# Altium PCB nexnclock_one_mainboard_rev_1_0.PcbDoc (part 2 of 2)
Units mm, origin at the board's own origin, x right, y up, seen from the top; angles counter-clockwise.
Board outline 106 x 35 mm, 2 copper layers (Top Layer, Bottom Layer), stack 1.571 mm thick; 128 components, 112 nets, 447 pads, 312 vias.
Unrouted connection lines stored in the file: 3.
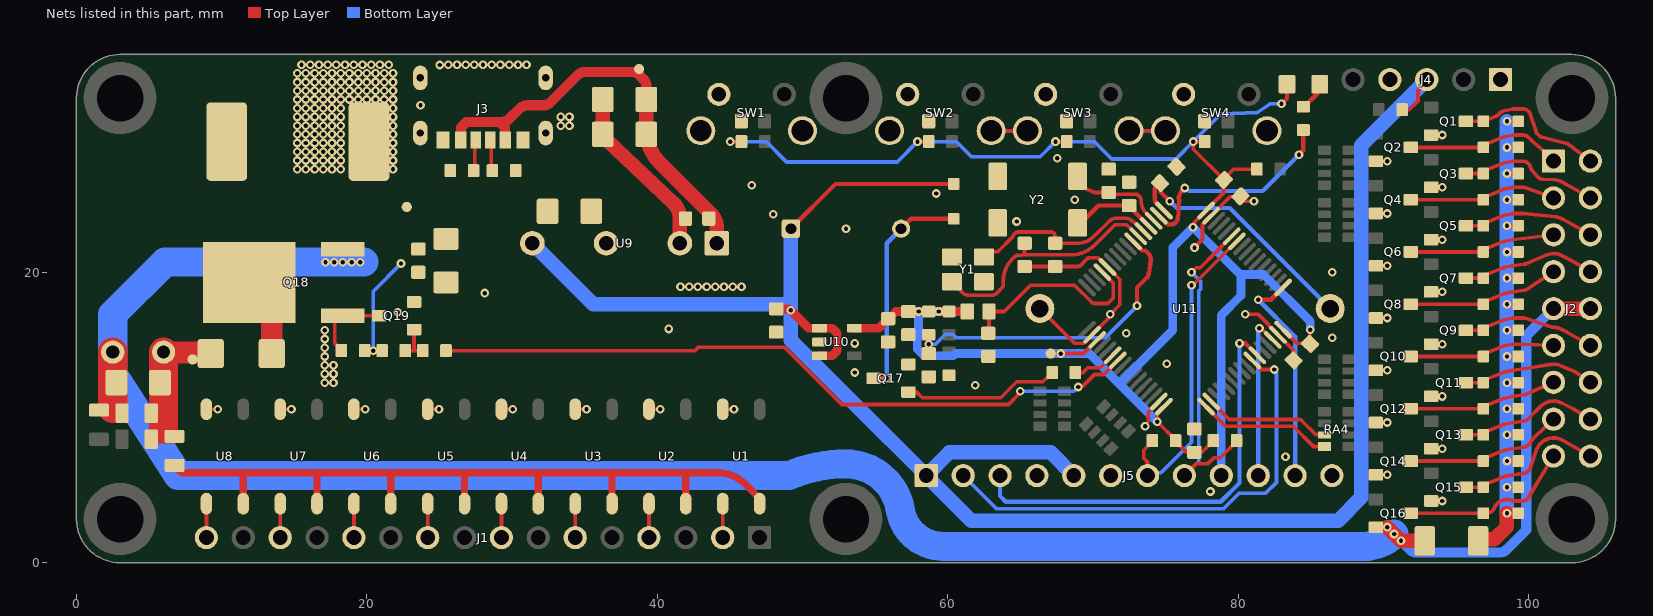
[diagram p2: the nets of this part, all layers, seen from the top]

## Via types
v1: diameter 0.6, hole 0.3, Top Layer to Bottom Layer, tented both sides, 264 vias
v2: diameter 0.6, hole 0.3, Top Layer to Bottom Layer, tented bottom, 48 vias

## Nets (pads, with @x,y where several pads share a name; then routed paths per layer and width w, separated by ;. In a path a pad name is that pad's centre, name@x,y a point inside that pad or via, vN(x,y) a via of type N, cw(c..) or ccw(c..) an arc to the next point about the centre after c; other vN are vias at no path point) (continued)
CATHODE_14: RA4.7 U11.34 | length 8.7
  Top Layer w0.254: U11.34@78.153,11.101 79.4,9.854 84.216,9.854 cw(c84.216,9.6) 84.368,9.803 cw(c84.216,9.6) 84.395,9.78 85.301,8.874 ccw(c85.48,9.054) 85.48,8.8 RA4.7@85.95,8.8
CATHODE_15: RA4.8 U11.33 | length 9.3
  Top Layer w0.254: U11.33@77.8,10.747 79.147,9.4 83.8,9.4 85.2,8 RA4.8@85.95,8
CRYSTAL_IN: C15.1 U11.5 Y1.1 | length 13.3
  Top Layer w0.254: Y1.1@62.5,21.05 62.853,21.403 63.334,21.403 ccw(c63.334,21.657) 63.513,21.477 64.427,22.39 ccw(c64.248,22.57) 64.469,22.445 64.53,22.554 cw(c64.912,22.338) 64.783,22.757 64.81,22.766 cw(c64.885,22.523) 64.885,22.777 67.118,22.777 cw(c67.118,22.523) 67.297,22.703 67.326,22.674 cw(c67.146,22.495) 67.4,22.495 C15.1@67.4,22 67.773,22 68.9,22 ccw(c68.9,23.687) 69.43,22.085 69.613,22.146 ccw(c69.47,22.58) 69.754,22.222 70.066,22.47 ccw(c69.909,22.669) 70.087,22.488 71.132,23.521 cw(c71.633,23.021) 71.134,23.523 cw(c71.633,23.021) 71.206,23.586 cw(c71.481,23.224) 71.208,23.587 ; 71.208,23.587 cw(c71.633,23.021) 71.633,23.729 72.225,23.729 cw(c72.225,23.021) 72.656,23.583 73.027,23.298 U11.5@73.486,22.839
CRYSTAL_OUT: C16.1 U11.6 Y1.3 | length 16.8
  Top Layer w0.254: Y1.3@60.3,19.35 60.773,18.877 60.853,18.797 cw(c60.403,18.349) 60.931,18.702 ccw(c61.457,19.058) 61.456,18.423 62.206,18.423 63.08,18.423 ccw(c63.08,18.87) 63.412,18.571 63.773,18.972 ccw(c63.584,19.142) 63.775,18.974 ccw(c63.584,19.142) 63.838,19.141 63.838,19.438 cw(c65.91,19.438) 64.441,20.899 ; 64.442,20.9 cw(c64.621,20.72) 64.448,20.906 64.612,21.058 cw(c64.912,20.738) 64.903,21.177 65.052,21.18 ccw(c65.046,21.434) 65.068,21.181 65.278,21.199 cw(c65.3,20.946) 65.3,21.2 ; C16.1@65.3,22 65.3,21.2 ; U11.6@73.133,22.485 72.398,23.203 ccw(c72.22,23.021) 72.22,23.275 71.633,23.275 ccw(c71.633,23.021) 71.454,23.201 70.134,21.881 cw(c68.485,23.536) 68.5,21.2 65.3,21.2
CRYSTAL_RTC_IN: C17.1 U11.3 Y2.1 | length 6.9
  Top Layer w0.254: Y2.1@68.95,26.6 68.95,26.302 69.47,25.782 70.052,25.522 ccw(c70.155,25.754) 70.155,25.5 C17.1@71.1,25.5 71.223,25.377 72.887,25.377 cw(c72.887,24.938) 73.327,24.94 cw(c72.887,24.938) 73.327,24.938 ccw(c74.595,24.937) 73.696,24.043 73.734,24.005 U11.3@74.193,23.546
CRYSTAL_RTC_OUT: C18.1 U11.4 Y2.4 | length 6
  Top Layer w0.3: Y2.4@68.95,23.4 69.45,23.65 70.312,24.512 cw(c70.524,24.3) 70.524,24.6 C18.1@72.5,24.6 72.55,24.6 72.85,24.3 72.85,24.182 U11.4@73.84,23.192
EQUAL_CATHODE: D1.1 D2.1 D3.1 D4.1 D5.1 D6.1 D7.1 D8.1 D9.1 D10.1 D11.1 D12.1 D13.1 D14.1 D15.1 D16.1 ZD1.1 | length 43
  Top Layer w0.254: v1(98.525,3.4) D16.1@99.3,3.4 ; v1(98.525,5.2) D15.1@99.3,5.2 ; v1(98.525,7) D14.1@99.3,7 ; v1(98.525,8.8) D13.1@99.3,8.8 ; v1(98.525,10.6) D12.1@99.3,10.6 ; v1(98.525,12.4) D11.1@99.3,12.4 ; v1(98.525,14.2) D10.1@99.3,14.2 ; v1(98.525,16) D9.1@99.3,16 ; v1(98.525,17.8) D8.1@99.3,17.8 ; v1(98.525,19.6) D7.1@99.3,19.6 ; v1(98.525,21.4) D6.1@99.3,21.4 ; v1(98.525,23.2) D5.1@99.3,23.2 ; v1(98.525,25) D4.1@99.3,25 ; v1(98.525,26.8) D3.1@99.3,26.8 ; v1(98.525,28.6) D2.1@99.3,28.6 ; v1(98.525,30.4) D1.1@99.3,30.4
  Top Layer w1: ZD1.1@96.74,1.7 ZD1.1@96.54,1.5 96.64,1.6 97.646,1.6 98.525,2.479 v1(98.525,3.4)
  Bottom Layer w1: v1(98.525,3.4) v1(98.525,5.2) v1(98.525,7) v1(98.525,8.8) v1(98.525,10.6) v1(98.525,12.4) v1(98.525,14.2) v1(98.525,16) v1(98.525,19.6) v1(98.525,21.4) v1(98.525,23.2) v1(98.525,25) v1(98.525,26.8) v1(98.525,28.6) v1(98.525,30.4)
GND: BAT1.2 C1.2 C2.2 C3.2 C4.2 C8.2 C9.2 C10.2 C11.2 C12.2 C13.2 C14.2 C15.2 C16.2 C17.2 C18.2 C19.2 C20.2 C21.2 C22.2 C23.2 C24.2 C25.2 J2.9 J2.10 J4.1 J4.4 J5.4 J5.6 J5.12 Q1.2 Q2.2 Q3.2 Q4.2 Q5.2 Q6.2 Q7.2 Q8.2 Q9.2 Q10.2 Q11.2 Q12.2 Q13.2 Q14.2 Q15.2 Q16.2 Q17.2 Q18.2 Q19.2 R18.2 R20.2 R22.2 SW1.2 SW1.3 SW1.4 SW2.2 SW2.3 SW2.4 SW3.2 SW3.3 SW3.4 SW4.2 SW4.3 SW4.4 U1.3 U2.3 U3.3 U4.3 U5.3 U6.3 U7.3 U8.3 U9.4 U10.2 U11.12 U11.18 U11.31 U11.47 U11.63 Y1.2 Y1.4 Y2.2 Y2.3 ZD1.2 | length 212
  Top Layer w0.254: U8.3@8.95,10.568 v1(9.725,10.568) ; U7.3@14.03,10.568 v1(14.805,10.568) ; U6.3@19.11,10.568 v1(19.885,10.568) ; U5.3@24.19,10.568 v1(24.965,10.568) ; U4.3@29.27,10.568 v1(30.045,10.568) ; U3.3@34.35,10.568 v1(35.125,10.568) ; U2.3@39.43,10.568 v1(40.205,10.568) ; U1.3@44.51,10.568 v1(45.285,10.568) ; SW2.4@63,29.75 SW3.3@65.5,29.75 ; C16.2@65.3,20.4 C15.2@67.4,20.4 68.97,20.4 ccw(c68.97,20.654) 69.122,20.451 ccw(c68.97,20.654) 69.149,20.474 69.601,20.926 ; BAT1.2@66.35,17.5 68.736,15.114 69.355,15.114 69.938,15.697 U11.18@69.951,15.697 71.134,16.88 71.134,17.034 v1(71.2,17.1) 71.855,17.755 71.855,19.52 U11.12@71.011,20.364 70.435,20.928 ccw(c70.257,20.746) 70.257,21 69.78,21 ccw(c69.78,20.746) 69.628,20.949 ccw(c69.78,20.746) 69.601,20.926 ; SW3.4@72.5,29.75 SW4.3@75,29.75 ; v1(73.6,9.4) 73.6,9.494 73.814,9.707 73.814,10.355 74.547,11.088 U11.31@74.547,11.101 ; v1(77,21.7) 77.552,22.252 77.552,23.286 78.153,23.887 U11.63@78.153,23.899 79.453,25.199 80.13,25.199 C19.2@80.166,25.234 80.5,24.9 v1(81.1,24.9) ; v1(80.5,17.1) 81.412,17.1 82.102,16.41 82.102,16.344 U11.47@82.749,15.697 83.804,14.642 83.804,14.432 83.799,14.426 83.834,14.391 C20.2@83.834,13.934 ; Q16.2@89.5,2.45 v1(90.275,2.45) ; Q14.2@89.5,6.05 v1(90.275,6.05) ; Q12.2@89.5,9.65 v1(90.275,9.65) ; Q10.2@89.5,13.25 v1(90.275,13.25) ; Q8.2@89.5,16.85 v1(90.275,16.85) ; Q6.2@89.5,20.45 v1(90.275,20.45) ; Q4.2@89.5,24.05 v1(90.275,24.05) ; Q2.2@89.5,27.65 v1(90.275,27.65) ; Q15.2@93.3,4.25 v1(94.075,4.25) ; Q13.2@93.3,7.85 v1(94.075,7.85) ; Q11.2@93.3,11.45 v1(94.075,11.45) ; Q9.2@93.3,15.05 v1(94.075,15.05) ; Q7.2@93.3,18.65 v1(94.075,18.65) ; Q5.2@93.3,22.25 v1(94.075,22.25) ; Q3.2@93.3,25.85 v1(94.075,25.85) ; Q1.2@93.3,29.45 v1(94.075,29.45)
  Top Layer w1: v1(90.275,2.45) v1(91.225,1.5) ZD1.2@92.86,1.5 ; J2.9@101.73,17.5 J2.10@104.27,17.5
  Top Layer w2: 2.5,10.625 C24.2@2.5,14.5
  Bottom Layer w0.254: SW2.4@63,29.75 SW3.3@65.5,29.75 ; SW3.4@72.5,29.75 SW4.3@75,29.75
  Bottom Layer w0.7: v1(91.225,1.5) 91.821,0.904 ccw(c92.315,1.4) 92.315,0.7 98.01,0.7 ccw(c98.01,1.4) 98.43,0.84 ccw(c98.01,1.4) 98.505,0.905 99.85,2.25 99.85,15.62 J2.9@101.73,17.5
  Bottom Layer w2: v1@19.8,20.7 6.1,20.7 2.5,17.1 C24.2@2.5,14.5 2.5,12.978 7,6 49.078,6 cw(c53,-3.214) 53,6.8 cw(c53,3) 56.749,3.621 ccw(c59.708,4.117) 59.708,1.117 88.649,1.117 ccw(c88.65,4.117) v1(90.75,1.975)
  other v1: 78.1,4.9 83.275,7.3 61.9,12.225 17.1,12.4 17.7,12.4 17.1,13 17.7,13 53.6,13.1 17.1,13.6 17.7,13.6 75.1,13.7 17.1,14.2 17.1,14.8 53.6,15.1 17.1,15.4 86.5,15.5 72.3,15.8 17.1,16 40.8,16.1 22.125,17.25 28.122,18.566 41.6,19 42.2,19 42.8,19 43.4,19 44,19 44.6,19 45.2,19 45.8,19 86.5,20 17.15,20.7 17.75,20.7 18.35,20.7 18.95,20.7 19.55,20.7 53,23 64.75,23.5 48,24 68.75,25 59.225,25.425 46.5,26 67.55,27.85
HOT_ANODE_0: J1.2 U1.4 | length 2.3
  Top Layer w0.254: J1.2@44.51,1.73 U1.4@44.51,4.068
HOT_ANODE_1: J1.4 U2.4 | length 2.3
  Top Layer w0.254: J1.4@39.43,1.73 U2.4@39.43,4.068
HOT_ANODE_2: J1.6 U3.4 | length 2.3
  Top Layer w0.254: J1.6@34.35,1.73 U3.4@34.35,4.068
HOT_ANODE_3: J1.8 U4.4 | length 2.3
  Top Layer w0.254: J1.8@29.27,1.73 U4.4@29.27,4.068
HOT_ANODE_4: J1.10 U5.4 | length 2.3
  Top Layer w0.254: J1.10@24.19,1.73 U5.4@24.19,4.068
HOT_ANODE_5: J1.12 U6.4 | length 2.3
  Top Layer w0.254: J1.12@19.11,1.73 U6.4@19.11,4.068
HOT_ANODE_6: J1.14 U7.4 | length 2.3
  Top Layer w0.254: J1.14@14.03,1.73 U7.4@14.03,4.068
HOT_ANODE_7: J1.16 U8.4 | length 2.3
  Top Layer w0.254: J1.16@8.95,1.73 U8.4@8.95,4.068
HOT_CATHODE_0: D1.2 J2.2 Q1.3 | length 10.4
  Top Layer w0.254: Q1.3@95.7,30.4 D1.2@96.9,30.4 97.15,30.502 97.78,30.758 ccw(c97.608,31.174) 97.951,30.883 cw(c98.525,30.4) 98.373,31.134 98.87,31.239 cw(c98.98,30.72) 98.98,31.25 99.58,31.25 99.62,31.25 cw(c99.62,30.72) 100.122,30.889 100.527,29.689 ccw(c100.953,29.832) 100.645,29.505 100.646,29.504 100.76,29.398 ccw(c101.066,29.727) 100.957,29.291 102.576,28.895 cw(c102.45,28.38) 102.771,28.802 J2.2@104.27,27.66
HOT_CATHODE_1: D2.2 J2.1 Q2.3 | length 10.7
  Top Layer w0.254: Q2.3@91.9,28.6 D2.2@96.9,28.6 97.15,28.85 98.242,29.295 cw(c98.525,28.6) 98.371,29.334 98.871,29.439 cw(c98.98,28.92) 98.978,29.45 ; 98.978,29.45 99.62,29.45 cw(c99.62,28.92) 99.948,29.337 cw(c99.67,28.983) 99.949,29.335 cw(c99.62,28.92) 99.951,29.334 cw(c99.67,28.982) 99.957,29.329 cw(c99.62,28.92) 99.986,29.303 100.173,29.124 ccw(c100.899,29.884) 100.178,29.12 100.181,29.117 100.349,28.96 ccw(c101.066,29.727) 100.368,28.943 101.08,28.31 J2.1@101.73,27.66
HOT_CATHODE_2: D3.2 J2.4 Q3.3 | length 9.7
  Top Layer w0.254: Q3.3@95.7,26.8 D3.2@96.9,26.8 97.15,27.05 98.242,27.495 cw(c98.525,26.8) 98.371,27.534 98.871,27.639 cw(c98.98,27.12) 98.98,27.65 99.62,27.65 cw(c99.62,27.12) 100.112,27.318 100.183,27.14 ; 100.184,27.14 ccw(c100.601,27.309) 100.254,27.022 100.602,26.602 ccw(c101.01,26.94) 100.982,26.411 101.795,26.368 101.798,26.368 cw(c101.73,25.12) 102.343,26.209 102.348,26.206 J2.4@104.27,25.12
HOT_CATHODE_3: D4.2 J2.3 Q4.3 | length 10.2
  Top Layer w0.254: Q4.3@91.9,25 D4.2@96.9,25 97.15,25.25 98.242,25.695 cw(c98.525,25) 98.371,25.734 98.871,25.839 cw(c98.98,25.32) 98.978,25.85 ; 98.978,25.85 99.62,25.85 cw(c99.62,25.32) 99.8,25.818 J2.3@101.73,25.12
HOT_CATHODE_4: D5.2 J2.6 Q5.3 | length 9.1
  Top Layer w0.254: Q5.3@95.7,23.2 D5.2@96.9,23.2 97.15,23.45 98.242,23.895 cw(c98.525,23.2) 98.371,23.934 98.869,24.038 98.872,24.039 cw(c98.98,23.52) 98.98,24.05 99.62,24.05 cw(c99.62,23.52) 99.674,24.047 99.677,24.047 101.857,23.823 cw(c101.73,22.58) 102.035,23.792 cw(c101.926,23.356) 102.038,23.792 ; 102.038,23.791 102.04,23.791 cw(c101.73,22.58) 102.343,23.669 102.348,23.666 J2.6@104.27,22.58
HOT_CATHODE_5: D6.2 J2.5 Q6.3 | length 10.1
  Top Layer w0.254: Q6.3@91.9,21.4 D6.2@96.9,21.4 97.15,21.65 98.242,22.095 cw(c98.525,21.4) 98.371,22.134 98.869,22.238 98.872,22.239 cw(c98.98,21.72) 98.917,22.246 98.92,22.247 J2.5@101.73,22.58
HOT_CATHODE_6: D7.2 J2.8 Q7.3 | length 9.2
  Top Layer w0.254: Q7.3@95.7,19.6 D7.2@96.9,19.6 97.15,19.85 98.242,20.295 cw(c98.525,19.6) 98.371,20.334 98.869,20.438 98.872,20.439 cw(c98.98,19.92) 98.905,20.445 98.909,20.445 99.694,20.555 ccw(c99.62,21.08) 99.827,20.592 101.243,21.191 101.245,21.192 cw(c101.73,20.04) 102.313,21.146 102.318,21.143 103.24,20.656 cw(c103.029,20.258) 103.26,20.644 J2.8@104.27,20.04
HOT_CATHODE_7: D8.2 J2.7 Q8.3 | length 10.4
  Top Layer w0.254: Q8.3@91.9,17.8 D8.2@96.9,17.8 97.15,18.05 98.242,18.495 cw(c98.525,17.8) 98.371,18.534 98.871,18.639 cw(c98.98,18.12) 98.906,18.645 99.694,18.755 ccw(c99.62,19.28) 99.912,18.838 J2.7@101.73,20.04
HOT_CATHODE_8: D9.2 J2.12 Q9.3 | length 9.2
  Top Layer w0.254: Q9.3@95.7,16 D9.2@96.9,16 97.15,16.25 98.242,16.695 cw(c98.525,16) 98.371,16.734 98.871,16.839 cw(c98.98,16.32) 98.98,16.85 99.66,16.85 cw(c99.66,16.4) 99.801,16.827 101.195,16.368 cw(c101.053,15.941) 101.232,16.354 ccw(c101.73,17.5) 101.37,16.303 101.616,16.229 ccw(c101.745,16.66) 101.74,16.21 cw(c101.73,14.96) 102.348,16.047 102.638,15.883 J2.12@104.27,14.96
HOT_CATHODE_9: D10.2 J2.11 Q10.3 | length 10
  Top Layer w0.254: Q10.3@91.9,14.2 D10.2@96.9,14.2 97.15,14.45 98.242,14.895 cw(c98.525,14.2) 98.371,14.934 98.871,15.039 cw(c98.98,14.52) 98.978,15.05 ; 98.978,15.05 99.62,15.05 cw(c99.62,14.52) 99.643,15.05 J2.11@101.73,14.96
HOT_CATHODE_10: D11.2 J2.14 Q11.3 | length 9.1
  Top Layer w0.254: Q11.3@95.7,12.4 D11.2@96.9,12.4 97.15,12.65 98.242,13.095 cw(c98.525,12.4) 98.371,13.134 98.871,13.239 cw(c98.98,12.72) 98.906,13.245 99.694,13.355 ccw(c99.62,13.88) 99.705,13.357 101.525,13.653 101.532,13.654 cw(c101.73,12.42) 102.224,13.568 102.23,13.566 103.209,13.143 ; 103.21,13.142 cw(c103.031,12.73) 103.287,13.1 J2.14@104.27,12.42
HOT_CATHODE_11: D12.2 J2.13 Q12.3 | length 10.2
  Top Layer w0.254: Q12.3@91.9,10.6 D12.2@96.9,10.6 97.15,10.85 98.242,11.295 cw(c98.525,10.6) 98.371,11.334 98.871,11.439 cw(c98.98,10.92) 98.906,11.445 99.694,11.555 ccw(c99.62,12.08) 99.831,11.594 J2.13@101.73,12.42
HOT_CATHODE_12: D13.2 J2.16 Q13.3 | length 9.6
  Top Layer w0.254: Q13.3@95.7,8.8 D13.2@96.9,8.8 97.15,9.05 98.242,9.495 cw(c98.525,8.8) 98.371,9.534 98.871,9.639 cw(c98.98,9.12) 98.906,9.645 ; 98.906,9.645 99.694,9.755 ccw(c99.62,10.28) 99.996,9.907 100.84,10.758 100.844,10.762 cw(c101.73,9.88) 102.294,10.996 102.298,10.993 103.11,10.583 103.111,10.582 cw(c102.906,10.181) 103.14,10.566 J2.16@104.27,9.88
HOT_CATHODE_13: D14.2 J2.15 Q14.3 | length 10.8
  Top Layer w0.254: Q14.3@91.9,7 D14.2@96.9,7 97.15,7.25 98.242,7.695 cw(c98.525,7) 98.371,7.734 98.871,7.839 cw(c98.98,7.32) 98.906,7.845 99.694,7.955 ccw(c99.62,8.48) 99.999,8.109 100.055,8.167 ccw(c99.733,8.481) 100.123,8.257 cw(c101.73,7.34) 100.462,8.687 J2.15@101.73,9.88
HOT_CATHODE_14: D15.2 J2.18 Q15.3 | length 10.5
  Top Layer w0.254: Q15.3@95.7,5.2 96.05,5.2 96.65,5.2 D15.2@96.9,5.2 97.15,5.45 98.242,5.895 cw(c98.525,5.2) 98.371,5.934 98.871,6.039 cw(c98.98,5.52) 98.906,6.045 99.303,6.1 99.694,6.155 ccw(c99.62,6.68) 100.121,6.507 100.293,7.007 100.548,7.747 cw(c101.73,7.34) 102.049,8.549 ; 102.05,8.548 cw(c101.936,8.113) 102.053,8.548 102.057,8.546 cw(c101.73,7.34) 102.344,8.429 102.349,8.426 J2.18@104.27,7.34
HOT_CATHODE_15: D16.2 J2.17 Q16.3 | length 11.9
  Top Layer w0.254: Q16.3@91.9,3.4 D16.2@96.9,3.4 ; D16.2@96.95,3.45 97.219,3.45 ccw(c97.217,3.9) 97.637,3.738 cw(c98.525,3.4) 98.879,4.282 ccw(c99.045,4.7) 99.043,4.25 99.606,4.25 ccw(c99.604,4.7) 99.989,4.467 J2.17@101.73,7.34
I2C1_SCL: J5.7 R10.2 U11.58 | length 21.9
  Top Layer w0.254: J5.7@73.77,6 73.765,6.005 73.765,6.927 73.5,7.192 73.5,7.75 74.1,8.35 R10.2@74.1,8.4 ; v1(76.8,19.1) 76.887,19.1 79.918,22.132 U11.58@79.921,22.132
  Bottom Layer w0.254: J5.7@73.77,6 73.967,6.197 74.697,6.197 76.8,8.3 v1(76.8,19.1)
I2C1_SDA: J5.8 R9.2 U11.59 | length 23.1
  Top Layer w0.254: J5.8@76.31,6 77.133,6.823 77.938,6.823 78.342,7.227 78.777,7.227 79.9,8.35 R9.2@79.9,8.4 ; v1(76.8,20) 77.119,20.319 77.401,20.319 78.448,21.366 U11.59@79.567,22.485
  Bottom Layer w0.254: J5.8@76.31,6 77.3,6.99 77.3,18.713 77.427,18.84 77.427,19.36 77.3,19.487 77.3,19.5 v1(76.8,20)
LED: R21.2 U11.2 | length 14.8
  Top Layer w0.3: U11.2@74.547,23.899 75.006,23.44 75.066,23.38 ccw(c75.277,23.593) 75.277,23.293 75.435,23.293 ccw(c75.433,23.593) 75.627,23.364 75.683,23.412 ccw(c75.36,23.793) 75.856,23.731 75.898,24.061 ccw(c75.6,24.098) 75.9,24.098 75.9,24.597 cw(c76.2,24.596) 75.916,24.691 ccw(c75.3,24.9) 75.93,25.061 cw(c76.221,25.134) 75.929,25.205 cw(c76.888,24.966) 76.187,25.662 v1(76.325,25.8) ; v1(84.2,28.1) 84.5,28.4 R21.2@84.5,29.8
  Bottom Layer w0.3: v1(76.325,25.8) 76.406,25.8 76.606,25.6 81.7,25.6 v1(84.2,28.1)
NetBUZZER1_2: BUZZER1.2 D17.2 Q17.3 | length 15.5
  Top Layer w0.3: Q17.3@54.9,12.7 v1(55.8,12.7) ; BUZZER1.2@56.8,23 57.484,23.684 D17.2@60.429,23.684
  Bottom Layer w0.3: v1(55.8,12.7) 55.8,22 BUZZER1.2@56.8,23
NetC22_1: C22.1 FB1.2 U11.13 | length 13.6
  Top Layer w0.254: C22.1@62.8,15.8 62.85,15.85 FB1.2@62.85,17.3 63.9,17.3 65.7,19.1 68.645,19.1 cw(c68.645,18.846) 68.797,19.049 cw(c68.645,18.846) 68.824,19.026 69.922,17.928 ccw(c70.101,18.108) 69.949,17.905 ccw(c70.101,18.108) 70.101,17.854 71.034,17.854 71.401,18.222 71.401,19.267 U11.13@70.658,20.01
NetC24_1: C24.1 C25.1 D18.1 R13.1 R17.1 R20.1 TP4.1 | length 11
  Top Layer w1: R17.1@5.2,8.675 R17.1@5.325,8.675 ; R17.1@5.35,8.7 R13.1@6.75,8.7 6.625,8.7 6,9.325
  Top Layer w1.5: C24.1@6,14.5 6.019,14.481 9.169,14.481 D18.1@9.25,14.4
  Top Layer w2: 6,9.325 C24.1@6,14.5
NetD18_2: D18.2 L1.2 Q18.3 | length 5.5
  Top Layer w1.5: Q18.3@11.9,19.3 13.45,17.75 D18.2@13.45,14.4
NetJ3_3: J3.3 R5.1 | length 2.2
  Top Layer w0.254: R5.1@27.35,27 27.425,27.075 27.425,29.035 J3.3@27.5,29.11
NetJ3_4: J3.4 R6.1 | length 2.2
  Top Layer w0.254: J3.4@28.5,29.11 28.575,29.035 28.575,27.075 R6.1@28.65,27
NetLED1_2: LED1.2 R21.1 | length 2
  Top Layer w0.3: R21.1@84.5,31.4 84.55,31.4 85.45,32.3 85.45,32.775 LED1.2@85.625,32.95
NetQ17_1: Q17.1 R14.2 | length 10.8
  Top Layer w0.254: Q17.1@57.3,11.75 57.85,11.75 58.25,11.35 63.663,11.35 64.765,12.452 66.552,12.452 66.877,12.777 66.927,12.777 67.2,13.05 R14.2@67.2,13.1
NetQ18_1: Q18.1 Q19.3 R16.2 | length 5.3
  Top Layer w0.254: R16.2@18.25,14.6 18.25,14.65 17.798,15.102 17.798,16.67 18.148,17.02 Q18.1@18.35,17.02 18.37,17 Q19.3@20.65,17
NetQ19_1: Q19.1 R15.2 R19.2 | length 2.6
  Top Layer w0.254: R15.2@22.65,14.6 23.25,14.6 ; Q19.1@23.25,16.05 23.25,14.6 ; R19.2@23.85,14.6 23.25,14.6
RAW_GND: C5.2 C6.2 C7.2 J3.1 J3.6 J3.7 J3.8 J3.9 J3.10 R5.2 R6.2 U9.2 | length 12.1
  Top Layer w1: C5.2@36.25,31.9 C6.2@36.25,29.5 36.5,29.125 41.091,24.789 cw(c40.06,23.7) 41.56,23.7 U9.2@41.56,22
  other v1: 33.35,30.1 33.95,30.1 33.35,30.7 33.95,30.7 23.7,31.5 25.014,34.277 25.607,34.288 26.207,34.288 26.807,34.288 27.4,34.3 28,34.3 28.607,34.288 29.2,34.3 29.8,34.3 30.407,34.288 31,34.3
RST: C23.1 R11.2 U11.7 | length 22.3
  Top Layer w0.3: C23.1@58.7,14.4 v1(58.7,15.05) R11.2@58.7,15.7 ; U11.7@72.779,22.132 73.411,21.5 73.619,21.5 73.794,21.326 73.81,21.31 cw(c73.35,20.85) 73.992,20.747 73.863,19.947 cw(c73.221,20.05) 73.819,19.795 73.789,19.726 cw(c73.514,19.844) 73.726,19.631 73.04,18.945 v1(73.04,17.685)
  Bottom Layer w0.254: v1(58.7,15.05) 59.163,15.05 59.84,15.727 60.36,15.727 60.606,15.481 70.835,15.481 v1(73.04,17.685)
SWCLK: J5.11 U11.49 | length 15.2
  Top Layer w0.3: v1(81.4,18.1) 82.253,18.1 U11.49@83.103,18.95
  Bottom Layer w0.3: v1(81.4,18.1) 83.93,15.57 J5.11@83.93,6
SWDIO: J5.10 U11.46 | length 11.4
  Top Layer w0.254: v1(81.475,16.15) 81.541,16.084 81.655,16.084 U11.46@82.396,15.343
  Bottom Layer w0.3: J5.10@81.39,6 81.39,15.984 81.475,16.069 v1(81.475,16.15)
TIM16_CH1: R14.1 U11.22 | length 3.1
  Top Layer w0.254: R14.1@68.8,13.1 69.325,13.1 69.648,13.423 70.505,13.423 U11.22@71.365,14.283
TIM17_CH1: R19.1 U11.23 | length 49.3
  Top Layer w0.254: R19.1@25.45,14.6 42.6,14.6 42.846,14.846 48.754,14.846 52.704,10.896 64.19,10.896 65,11.706 v1(65,11.8) ; v1(69,12.1) 69.066,12.166 69.321,12.166 70.114,12.96 70.749,12.96 U11.23@71.718,13.929
  Bottom Layer w0.254: v1(65,11.8) 68.696,11.8 68.996,12.1 v1(69,12.1)
USART1_RX: J5.2 U11.42 | length 32.9
  Top Layer w0.254: U11.42@80.982,13.929 81.611,13.3 v1(82.5,13.3)
  Bottom Layer w0.254: J5.2@61.07,6 63.347,3.723 79.015,3.723 80.065,4.773 81.898,4.773 82.65,5.525 82.65,7.038 82.648,7.04 82.648,7.56 82.65,7.562 82.65,13.056 82.5,13.206 v1(82.5,13.3)
USART1_TX: J5.3 U11.43 | length 29.8
  Top Layer w0.3: v1(80.1,15.1) 80.518,15.1 U11.43@81.335,14.283
  Bottom Layer w0.3: J5.3@63.61,6 63.61,4.59 64,4.2 78.818,4.2 80.1,5.482 v1(80.1,15.1)
VBAT: BAT1.1 C14.1 U11.1 | length 17.9
  Top Layer w0.3: U11.1@74.9,24.253 74.441,24.712 74.362,24.791 cw(c74.575,25.003) 74.275,25.003 74.275,25.775 C14.1@74.634,26.134 74.67,26.099 74.67,25.53 v1(75.3,24.9)
  Bottom Layer w0.3: v1(75.3,24.9) 75.775,24.425 79.425,24.425 BAT1.1@86.35,17.5
VBUS: C5.1 C6.1 C7.1 J3.2 J3.5 TP1.1 U9.1 | length 29.7
  Top Layer w0.7: J3.2@26.48,29.11 26.48,29.959 26.5,29.979 26.881,30.36 29.119,30.36 ; J3.5@29.52,29.11 29.52,29.959 29.5,29.979 29.365,30.115 29.119,30.36 ; 34.545,33.595 32.654,31.704 cw(c32.16,32.2) 32.58,31.64 cw(c32.16,32.2) 32.16,31.5 31.04,31.5 ccw(c31.04,30.8) 30.62,31.36 ccw(c31.04,30.8) 30.546,31.296 29.814,30.564 cw(c29.32,31.06) 29.74,30.5 cw(c29.32,31.06) 29.32,30.36 29.119,30.36 ; 34.546,33.596 cw(c35.04,33.1) 34.62,33.66 cw(c35.04,33.1) 35.04,33.8 38.26,33.8 cw(c38.26,33.1) 38.754,33.596 39.046,33.304 cw(c38.55,32.81) 39.25,32.81 C5.1@39.25,31.9
  Top Layer w1: C5.1@39.25,31.9 C6.1@39.25,29.5 39.305,29.125 ccw(c42.314,29.76) 40.136,27.589 43.788,23.938 43.79,23.935 cw(c42.6,23.021) 44.1,23.021 44.1,22.35 U9.1@44.1,22
VCC_3V3: C12.1 C13.1 C19.1 C20.1 C21.1 FB1.1 J5.9 LED1.1 R1.1 R2.1 R3.1 R4.1 R8.1 R9.1 R10.1 R11.1 R12.1 TP3.1 U10.5 U11.19 U11.32 U11.48 U11.64 | length 139
  Top Layer w0.254: v1(45.025,29) R1.1@45.8,29 ; v1(57.925,29) R2.1@58.7,29 ; TP3.1@67.1,14.4 v1(67.8,14.4) 69.361,14.4 U11.19@70.304,15.343 ; v1(67.425,29) R3.1@68.2,29 ; U11.32@74.9,10.747 74.441,10.288 v1(74.441,9.709) 75.7,8.45 R10.1@75.7,8.4 75.7,8.35 76.45,7.6 C21.1@77,7.6 77.5,7.6 77.977,8.077 78.027,8.077 78.3,8.35 R9.1@78.3,8.4 ; v1(76.9,23.1) 76.966,23.166 76.966,23.418 U11.64@77.8,24.253 U11.64@77.8,24.253 78.999,25.452 C19.1@78.999,26.401 ; R4.1@77.7,29 v1(76.925,29) 76.925,28.475 C19.1@78.999,26.401 ; R8.1@81.3,27.1 79.698,27.1 C19.1@78.999,26.401 ; U11.48@83.103,16.05 84.052,15.101 C20.1@84.93,15.101 ; C20.1@84.966,15.066 C20.1@84.93,15.101 ; v1(84.966,16.034) 84.93,15.999 C20.1@84.93,15.101
  Top Layer w0.3: v1(83,31.6) 83.375,31.975 LED1.1@83.375,32.95
  Top Layer w0.6: U10.5@53.575,16.15 55.25,16.15 55.7,16.6 55.7,16.65 55.85,16.8 C12.1@55.9,16.8 55.95,16.8 56.45,17.3 C13.1@57.3,17.3 v1(58,17.3) R11.1@58.7,17.3 ; v1(59.4,17.3) FB1.1@61.35,17.3
  Bottom Layer w0.254: v1(45.025,29) 47.5,29 48.9,27.6 56.525,27.6 v1(57.925,29) 60.6,29 61.646,27.954 66.379,27.954 v1(67.425,29) 70.1,29 71.3,27.8 75.725,27.8 v1(76.925,29) 78.751,30.826 78.825,30.9 81.321,31.006 82.2,31.6 v1(83,31.6)
  Bottom Layer w0.6: v1(59.4,17.3) v1(58,17.3) 58,15.481 57.9,15.381 57.9,14.719 58.369,14.25 60.381,14.25 60.531,14.4 v1(67.8,14.4) 69.75,14.4 71.825,12.325 ; v1(74.441,9.709) 71.825,12.325 ; J5.9@78.85,6 78.85,17.05 80.2,18.4 80.2,19.694 80.354,19.848 81.752,19.848 84.966,16.634 v1(84.966,16.034) ; 80.252,19.748 v1(76.9,23.1) 75.5,21.7 75.5,16 71.825,12.325
VCC_5V0: BUZZER1.1 C8.1 C9.1 C10.1 C11.1 D17.1 J4.3 J5.1 J5.5 L1.1 R7.1 R15.1 R16.1 TP2.1 U9.6 U10.1 U10.3 | length 145.5
  Top Layer w0.254: R16.1@19.85,14.6 v1(20.45,14.6) R15.1@21.05,14.6 ; R7.1@91.3,31.2 91.8,31.2 92.4,31.8 92.4,32.527 93,33.127 J4.3@93,33.27
  Top Layer w0.3: BUZZER1.1@49.2,23 52.284,26.084 D17.1@60.429,26.084
  Top Layer w0.6: C11.1@48.2,17.475 49.1,17.475 v1(49.2,17.375) 50.425,16.15 U10.1@51.175,16.15 52.049,16.15 52.4,15.799 52.4,14.601 52.049,14.25 U10.3@51.175,14.25
  Bottom Layer w0.254: v1(20.45,14.6) 20.45,18.7 v1(22.35,20.6)
  Bottom Layer w1: U9.6@31.4,22 35.6,17.8 49.2,17.8 ; BUZZER1.1@49.2,23 49.2,18.773 49.2,17.8 ; J5.1@58.53,6 61.634,2.896 86.896,2.896 88.5,4.5 88.5,28.76 J4.3@93,33.26 ; J5.5@68.69,6 67.09,7.6 60.13,7.6 J5.1@58.53,6 53.715,10.815 49.2,15.33 49.2,17.3 49.2,17.8
  other v1: 15.2,27.1 15.8,27.1 16.4,27.1 17,27.1 17.6,27.1 18.2,27.1 21.8,27.1 15.2,27.7 15.8,27.7 16.4,27.7 17,27.7 17.6,27.7 18.2,27.7 21.8,27.7 15.2,28.3 15.8,28.3 16.4,28.3 17,28.3 17.6,28.3 18.2,28.3 21.8,28.3 15.2,28.9 15.8,28.9 16.4,28.9 17,28.9 17.6,28.9 18.2,28.9 21.8,28.9 15.2,29.5 15.8,29.5 16.4,29.5 17,29.5 17.6,29.5 18.2,29.5 21.8,29.5 15.2,30.1 15.8,30.1 16.4,30.1 17,30.1 17.6,30.1 18.2,30.1 21.8,30.1 15.2,30.7 15.8,30.7 16.4,30.7 17,30.7 17.6,30.7 18.2,30.7 21.8,30.7 15.2,31.3 15.8,31.3 16.4,31.3 17,31.3 17.6,31.3 18.2,31.3 21.8,31.3 15.2,31.9 15.8,31.9 16.4,31.9 17,31.9 17.6,31.9 18.2,31.9 18.8,31.9 19.4,31.9 20,31.9 20.6,31.9 21.2,31.9 21.8,31.9 15.2,32.5 15.8,32.5 16.4,32.5 17,32.5 17.6,32.5 18.2,32.5 18.8,32.5 19.4,32.5 20,32.5 20.6,32.5 21.2,32.5 21.8,32.5 15.2,33.1 15.8,33.1 16.4,33.1 17,33.1 17.6,33.1 18.2,33.1 18.8,33.1 19.4,33.1 20,33.1 20.6,33.1 21.2,33.1 21.8,33.1 15.2,33.7 15.8,33.7 16.4,33.7 17,33.7 17.6,33.7 18.2,33.7 18.8,33.7 19.4,33.7 20,33.7 20.6,33.7 21.2,33.7 21.8,33.7 15.5,34.3 16.1,34.3 16.7,34.3 17.3,34.3 17.9,34.3 18.5,34.3 19.1,34.3 19.7,34.3 20.3,34.3 20.9,34.3 21.5,34.3
VCC_HV: R13.2 U1.6 U2.6 U3.6 U4.6 U5.6 U6.6 U7.6 U8.6 | length 56.3
  Top Layer w0.5: R13.2@6.75,6.7 7.25,6.2 41.95,6.2 ; U8.6@11.49,4.068 11.49,6.18 ; U7.6@16.57,4.068 16.57,6.18 ; U6.6@21.65,4.068 21.65,6.18 ; U5.6@26.73,4.068 26.73,6.18 ; U4.6@31.81,4.068 31.81,6.18 ; U3.6@36.89,4.068 36.89,6.18 ; U2.6@41.97,4.068 41.97,6.18 41.95,6.2 ; U1.6@47.05,4.068 47.05,4.418 46.072,5.396 ccw(c44.129,3.45) 44.129,6.2 41.95,6.2
pads on no net: H1.1 H2.1 H3.1 H4.1 H5.1 H6.1 J1.1 J1.3 J1.5 J1.7 J1.9 J1.11 J1.13 J1.15 U10.4 U11.14 U11.17 U11.20 U11.41 U11.44 U11.45 U11.50
copper on no net:
  other v2: 3,1 53,1 103,1 1.6,1.6 4.4,1.6 51.6,1.6 54.4,1.6 101.6,1.6 104.4,1.6 1,3 5,3 51,3 55,3 101,3 105,3 1.6,4.4 4.5,4.4 51.6,4.4 54.5,4.4 101.6,4.4 104.5,4.4 3,5 53,5 103,5 3,30 53,30 103,30 1.6,30.6 4.4,30.6 51.6,30.6 54.4,30.6 101.6,30.6 104.4,30.6 1,32 5,32 51,32 55,32 101,32 105,32 1.6,33.4 4.5,33.4 51.6,33.4 54.5,33.4 101.6,33.4 104.5,33.4 3,34 53,34 103,34

## Polygon pours and split planes (outlines as drawn)
GND on Top Layer "Top Layer-No Net" (solid, pour order 19): 17.5,10 49.5,10 50.5,9 50.5,0 87.5,0 87.5,31 88.5,32 106,32 106,35 42.5,35 42.5,28 43.5,28 47.5,24 47.5,20.5 46.5,19.5 39.5,19.5 38.5,20.5 38.5,24.7 37.5,25.7 34.25,25.7 33.9,25.467 33.9,22.9 16.8,22.9 16.8,11.8 18.3,11.8 17.5,11
NetD18_2 on Top Layer "NONET_L01_P-001" (solid, pour order 18): 11.75,34.5 12.25,34 12.25,26 15.25,23 15.25,16.5 7.75,16.5 7.75,34 8.25,34.5
RAW_GND on Top Layer "NONET_L01_P-001" (solid, pour order 16): 32.409,27.8 30.57,26.075 25.126,26.124 23.25,28 23.25,35 36.75,35 37.75,34 37.75,27.8
VCC_5V0 on Top Layer "NONET_L01_P-001" (solid, pour order 15): 14.75,34 15.751,35.001 21.249,35.001 22.25,34 22.25,27.1 24.65,24.7 30.85,24.7 31.85,25.7 33.55,25.7 33.75,25.5 33.75,21 32.75,20 21.75,20 14.75,27
RAW_GND on Bottom Layer "NONET_L01_P-001" (solid, pour order 17): 32.409,27.8 30.57,26.075 25.126,26.124 23.25,28 23.25,35 36.75,35 37.75,34 37.75,27.8
VCC_5V0 on Bottom Layer "NONET_L01_P-001" (solid, pour order 14): 14.75,34 15.751,35.001 21.249,35.001 22.25,34 22.25,23.1 18.65,23.1 14.75,27
GND on Bottom Layer "Bottom Layer-No Net" (solid, remove dead copper, pour order 13): 9,9.5 47.5,9.5 50.5,6.5 50.5,0 88,0 88,29 91,32 106,32 106,35 42.5,35 42.5,28 43.5,28 47.5,24 47.5,20.5 46.5,19.5 39.5,19.5 38.5,20.5 38.5,24.7 31.55,24.7 28.25,22.5 9,22.5
GND on Bottom Layer "NONET_L01_P-001" (solid, pour order 5): 86.9,1.942 88.381,3.366 88.225,27.725 90.5,30 94.5,30 96.5,28 96.5,0 86.9,0

## Keep-outs
Keep-Out Layer:
  the board outline again, w0.05

## Other copper
Bottom Layer:
  text "20250608" at 28.173,23.583 h0.64
  text ".Pcb_File_Name_No_Path" at 28.173,22.636 h0.64
  text "nexnpvnk / nexnclock one" at 35,11.227 h3

## Silkscreen, mask and mechanical layers (free items; w line width, h text height)
Top Overlay:
  lines w0.2: 59.805,0.125 59.805,6.9 ; 62.345,0.125 62.345,6.9 ; 64.885,0.125 64.885,6.9 ; 69.965,0.125 69.965,6.9 ; 72.505,0.125 72.505,6.9 ; 75.045,0.125 75.045,6.9 ; 80.125,0.125 80.125,6.9 ; 82.665,0.125 82.665,6.9 ; 85.205,0.125 85.205,6.9
  lines w0.6: 57.265,0.125 57.265,6.9 ; 67.425,0.125 67.425,6.9 ; 77.585,0.125 77.585,6.9 ; 87.745,0.125 87.745,6.9
  text "RX" at 61.472,0.361 h1.5 r90
  text "TX" at 64.072,0.363 h1.5 r90
  text "DIO" at 81.871,0.296 h1.5 r90
  text "SCL" at 74.231,0.198 h1.5 r90
  text "CLK" at 84.371,0.198 h1.5 r90
  text "3V3" at 79.371,0.133 h1.5 r90
  text "5V0" at 58.971,0.1 h1.5 r90
  text "GND" at 66.571,0.1 h1.5 r90
  text "5V0" at 69.131,0.1 h1.5 r90
  text "GND" at 71.631,0.1 h1.5 r90
  text "GND" at 86.971,0.1 h1.5 r90
  text "SDA" at 76.731,0.068 h1.5 r90
Bottom Overlay:
  drawing of 15 lines, arcs and shapes, not listed
  text "Designed by nexnpvnk in Russia / Assembled in Russia/China" at 37.554,6.769 h1.5
  text "RX" at 60.37,2.418 h2 r270
  text "TX" at 62.97,2.42 h2 r270
  text "DIO" at 80.771,2.331 h2 r270
  text "SCL" at 73.131,2.201 h2 r270
  text "CLK" at 83.271,2.2 h2 r270
  text "3V3" at 78.271,2.113 h2 r270
  text "5V0" at 57.871,2.089 h2 r270
  text "GND" at 65.471,2.069 h2 r270
  text "5V0" at 68.031,2.069 h2 r270
  text "GND" at 70.531,2.069 h2 r270
  text "GND" at 85.871,2.069 h2 r270
  text "SDA" at 75.631,2.027 h2 r270
Bottom Solder:
  text "nexnpvnk / nexnclock one" at 35,11.227 h3

## Text inside footprints (layer, text, board x,y; h text height)
D1: Top Overlay ">" at 100.175,30.6 h0.5 r180
D2: Top Overlay ">" at 100.175,28.8 h0.5 r180
D3: Top Overlay ">" at 100.175,27 h0.5 r180
D4: Top Overlay ">" at 100.175,25.2 h0.5 r180
D5: Top Overlay ">" at 100.175,23.4 h0.5 r180
D6: Top Overlay ">" at 100.175,21.6 h0.5 r180
D7: Top Overlay ">" at 100.175,19.8 h0.5 r180
D8: Top Overlay ">" at 100.175,18 h0.5 r180
D9: Top Overlay ">" at 100.175,16.2 h0.5 r180
D10: Top Overlay ">" at 100.175,14.4 h0.5 r180
D11: Top Overlay ">" at 100.175,12.6 h0.5 r180
D12: Top Overlay ">" at 100.175,10.8 h0.5 r180
D13: Top Overlay ">" at 100.175,9 h0.5 r180
D14: Top Overlay ">" at 100.175,7.2 h0.5 r180
D15: Top Overlay ">" at 100.175,5.4 h0.5 r180
D16: Top Overlay ">" at 100.175,3.6 h0.5 r180
D17: Top Overlay ">" at 60.179,27.009 h0.5 r270
D18: Top Overlay ">" at 8.738,12.835 h0.5 r45
J1: Top Overlay ">" at 49,2.2 h1 r180
J2: Top Overlay ">" at 100.47,29.223 h1 r315
J4: Top Overlay ">" at 100.05,33.8 h1 r180
J5: Top Overlay ">" at 56.15,2.7 h1
Q1: Top Overlay ">" at 92.275,31.05 h0.5
Q2: Top Overlay ">" at 88.735,30.112 h0.5 r315
Q3: Top Overlay ">" at 92.535,28.312 h0.5 r315
Q4: Top Overlay ">" at 88.735,26.512 h0.5 r315
Q5: Top Overlay ">" at 92.535,24.712 h0.5 r315
Q6: Top Overlay ">" at 88.735,22.912 h0.5 r315
Q7: Top Overlay ">" at 92.535,21.112 h0.5 r315
Q8: Top Overlay ">" at 88.735,19.312 h0.5 r315
Q9: Top Overlay ">" at 92.535,17.512 h0.5 r315
Q10: Top Overlay ">" at 88.735,15.712 h0.5 r315
Q11: Top Overlay ">" at 92.535,13.912 h0.5 r315
Q12: Top Overlay ">" at 88.735,12.112 h0.5 r315
Q13: Top Overlay ">" at 92.535,10.312 h0.5 r315
Q14: Top Overlay ">" at 88.735,8.512 h0.5 r315
Q15: Top Overlay ">" at 92.535,6.712 h0.5 r315
Q16: Top Overlay ">" at 88.735,4.912 h0.5 r315
Q17: Top Overlay ">" at 58.225,11.95 h0.5 r180
Q19: Top Overlay ">" at 24.375,16.35 h0.5 r180
U1: Top Overlay ">" at 46.788,11.72 h0.5 r270
U2: Top Overlay ">" at 41.708,11.72 h0.5 r270
U3: Top Overlay ">" at 36.628,11.72 h0.5 r270
U4: Top Overlay ">" at 31.548,11.72 h0.5 r270
U5: Top Overlay ">" at 26.468,11.72 h0.5 r270
U6: Top Overlay ">" at 21.388,11.72 h0.5 r270
U7: Top Overlay ">" at 16.308,11.72 h0.5 r270
U8: Top Overlay ">" at 11.2,11.725 h0.5 r270
U9: Top Overlay ">" at 45.323,24.03 h1 r225
U10: Top Overlay ">" at 50.175,15.925 h0.5
U11: Top Overlay ">" at 75.373,25.43 h1 r225
Y2: Top Overlay ">" at 67.17,27.423 h1 r315
ZD1: Top Overlay ">" at 97.725,1.75 h0.5 r180